# EAGLE board Gps_System_v1.00 (EAGLE 9.6.2)
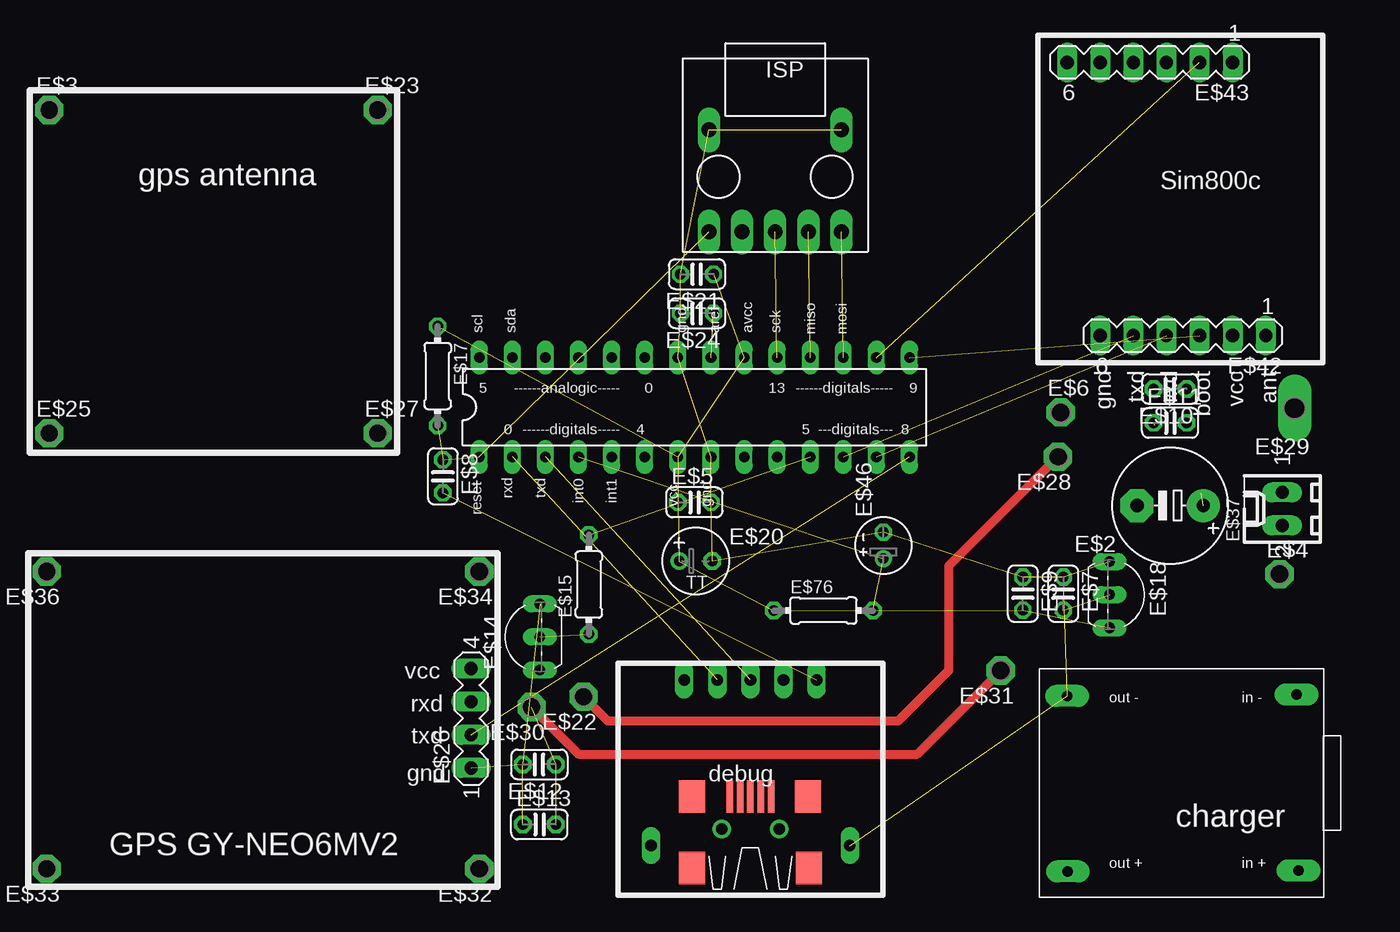
[diagram p0: board, top side]
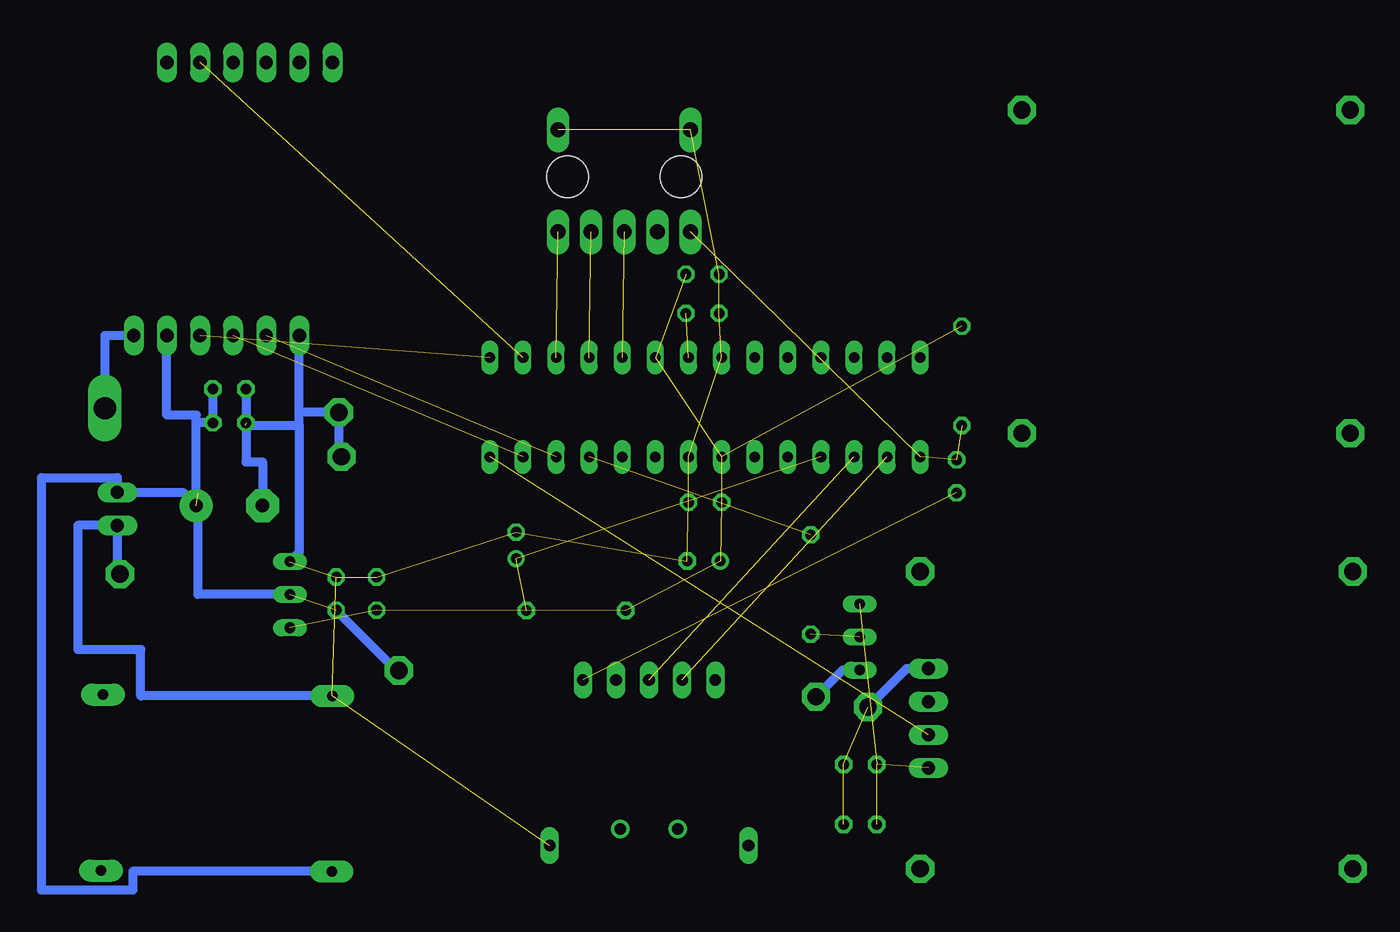
[diagram p1: board, bottom side, seen from below]

No outline drawn. Coordinates in mm, seen from the top.
Copper layers (1*16): Top 0.035mm / dielectric 1.5mm / Bottom 0.035mm
Design rules "default *": minimum track width 0.7mm, minimum drill 24mil, track to track 8mil, track to pad 8mil, pad to pad 8mil, via to via 8mil, smd to smd 8mil, copper to edge 40mil, drill to drill 8mil, minimum pad ring 10mil, minimum via ring 8mil, stop-mask expansion 4mil, vias tented up to drill 0mil, thermal gap 10mil

## Footprints (pad centres in the part's own frame; a part is rotated, then mirrored left to right if it is on the bottom)
USBMINIB = smd 2.5 x 0.5: D+ -3.85,0; D- -3.85,0.8; GND -3.85,-1.6; ID -3.85,-0.8; VBUS -3.85,1.6 | drill 0.9 long: P$1 5.08,0; P$2 5.08,2.54; P$3 5.08,5.08; P$4 5.08,-2.54; P$5 5.08,-5.08; P$6 -7.62,7.62; P$7 -7.62,-7.62 | drill 0.9: P$8 -6.35,2.2; P$9 -6.35,-2.2 | smd 2.5 x 2: P$10 -9.35,-4.5; P$11 -9.35,4.5; P$12 -3.85,-4.4; P$13 -3.85,4.5
E5-8,5 = drill 1.016 pad 2.54: + -2.54,0 | drill 1.016 pad 2.54 octagon: - 2.54,0
P1-13 = drill 1.321 pad 2.159 octagon: TP 0,0
C025-024X044 = drill 0.813 octagon: 1 -1.27,0; 2 1.27,0
TO92- = drill 0.813 long: 1 2.54,0; 2 0,0; 3 -2.54,0
0204/7 = drill 0.813 octagon: 1 -3.81,0; 2 3.81,0
USB-MICRO-PCB = drill 1.143 long: P$1 -5.08,6.35; P$2 -2.54,6.35; P$3 0,6.35; P$4 2.54,6.35; P$5 5.08,6.35; P$6 5.08,-1.47; P$7 -5.08,-1.47 | hole 3.2: -4.34,2.12; 4.36,2.12
ATMEGA328 = drill 0.813 long: 1 -16.51,-3.81; 2 -13.97,-3.81; 3 -11.43,-3.81; 4 -8.89,-3.81; 5 -6.35,-3.81; 6 -3.81,-3.81; 7 -1.27,-3.81; 8 1.27,-3.81; 9 3.81,-3.81; 10 6.35,-3.81; 11 8.89,-3.81; 12 11.43,-3.81; 13 13.97,-3.81; 14 16.51,-3.81; 15 16.51,3.81; 16 13.97,3.81; 17 11.43,3.81; 18 8.89,3.81; 19 6.35,3.81; 20 3.81,3.81; 21 1.27,3.81; 22 -1.27,3.81; 23 -3.81,3.81; 24 -6.35,3.81; 25 -8.89,3.81; 26 -11.43,3.81; 27 -13.97,3.81; 28 -16.51,3.81
TT2D5 = drill 0.813: + -1.27,0 | drill 0.813 octagon: - 1.27,0
MA04-1 = drill 1.016 long: 1 -3.81,0; 2 -1.27,0; 3 1.27,0; 4 3.81,0
P1-17Y = drill 1.702 pad 2.121 long: TP 0,0
6410-02 = drill 1.016 long: 1 1.27,0; 2 -1.27,0
LIPO_CHARGER = drill 0.8 pad 1.676 long: P$5 -8.3,6.85; P$6 9.3,6.95; P$7 -8.25,-6.6; P$8 9.45,-6.55
MA06-1 = drill 1.016 long: 1 -6.35,0; 2 -3.81,0; 3 -1.27,0; 4 1.27,0; 5 3.81,0; 6 6.35,0
E2-4 = drill 0.813 pad 1.27: + -1.016,0 | drill 0.813 pad 1.27 octagon: - 1.016,0

## Placement (x,y rotation side)
E$1  [USBMINIB]  56.2,12.2 90 top
E$2  [E5-8,5]  88.4,30.66 180 top
E$3  [P1-13]  2.4,61 0 top
E$4  [P1-13]  96.8,25.4 0 top
E$5  100nF  [C025-024X044]  51.9,30.9 0 top
E$6  [P1-13]  80,37.8 0 top
E$7  1uF  [C025-024X044]  80.2,23.9 270 top
E$8  0.1uF  [C025-024X044]  32.6,32.9 270 top
E$9  1uF  [C025-024X044]  77.1,23.9 270 top
E$10  100nF  [C025-024X044]  88.4,39.6 180 top
E$11  10uF  [C025-024X044]  88.4,37 0 top
E$12  100nF  [C025-024X044]  40,10.8 180 top
E$13  10uF  [C025-024X044]  40,6.2 0 top
E$14  S9013 h331  [TO92-]  40.04,20.58 90 top
E$15  1k  [0204/7]  43.8,24.6 90 top
E$16  [USB-MICRO-PCB]  58.1,58 180 top
E$17  10k  [0204/7]  32.2,40.6 270 top
E$18  MCP1702  [TO92-]  83.76,23.82 270 top
E$19  [ATMEGA328]  51.9,38.2 0 top
E$20  10uF  [TT2D5]  52,26.4 0 top
E$21  100nF  [C025-024X044]  52.1,48.4 180 top
E$22  [P1-13]  43.4,16 180 top
E$23  [P1-13]  27.6,61 0 top
E$24  100nF  [C025-024X044]  52.1,45.4 180 top
E$25  [P1-13]  2.4,36.2 0 top
E$26  [MA04-1]  34.77,14.34 90 top
E$27  [P1-13]  27.6,36.2 0 top
E$28  [P1-13]  79.8,34.4 180 top
E$29  [P1-17Y]  97.95,38.13 180 top
E$30  [P1-13]  39.4,15.2 180 top
E$31  [P1-13]  75.4,18 180 top
E$32  [P1-13]  35.4,2.8 180 top
E$33  [P1-13]  2.2,2.8 180 top
E$34  [P1-13]  35.4,25.6 180 top
E$36  [P1-13]  2.2,25.6 180 top
E$37  [6410-02]  97,30.4 90 top
E$41  [LIPO_CHARGER]  88.8,9.2 0 top
E$42  [MA06-1]  89.38,43.69 180 top
E$43  [MA06-1]  86.84,64.65 180 top
E$46  TILT SENSOR  [E2-4]  66.4,27.6 90 top
E$76  10k  [0204/7]  61.8,22.6 0 top

## Library data of the parts
E$1 E$16 E$19 E$41 = LSGPackages
E$2 = ref-packages-longpad
E$3 E$4 E$6 E$22 E$23 E$25 E$27-E$34 E$36 = testpad
E$5 E$7-E$13 E$21 E$24 E$46 = rcl
E$14 E$18 = transistor-fet
E$15 E$17 E$76 = eagle-ltspice
E$20 = resistor
E$26 E$42 E$43 = con-lstb
E$37 = con-molex

## Nets
GND: E$1.P$7 E$2.- E$4.TP E$5.2 E$6.TP E$7.1 E$9.1 E$10.2 E$11.1 E$14.3 E$16.P$6 E$16.P$7 E$18.3 E$19.8 E$19.22 E$20.- E$21.2 E$22.TP E$24.2 E$28.TP E$37.2 E$41.P$5 E$42.6 E$46.-
S$2: E$12.2 E$13.1 E$14.1 E$26.1
S$3: E$15.2 E$19.11
S$4: E$19.21 E$24.1
S$5: E$16.P$2 E$19.18
S$8: E$19.12 E$42.5
S$9: E$19.13 E$42.4
S$10: E$19.15 E$42.3
S$11: E$16.P$3 E$19.19
S$12: E$14.2 E$15.1
S$13: E$16.P$1 E$19.17
S$14: E$1.P$2 E$19.2
S$15: E$1.P$1 E$19.3
S$16: E$1.P$5 E$8.2
S$18: E$19.14 E$26.2
S$19: E$19.16 E$43.2
S$20: E$8.1 E$16.P$5 E$17.2 E$19.1
S$21: E$29.TP E$42.1
S$22: E$19.4 E$46.+ E$76.2
VCC3.3V: E$5.1 E$9.2 E$17.1 E$18.1 E$19.7 E$19.20 E$20.+ E$21.1 E$76.1
VCC5.1V: E$2.+ E$7.2 E$10.1 E$11.2 E$12.1 E$13.2 E$18.2 E$26.4 E$30.TP E$31.TP E$37.1 E$41.P$7 E$42.2

## Tracks (layer width: path | path; a pad name or v marks a point on that pad's centre or on a via)
GND  (14 unrouted)
  Top 0.7: E$22.TP 45.28,14.12 67.52,14.12 71.4,18 71.4,26 E$28.TP
  Bottom 0.7: 83.03,36.8 83.03,37.8 | 83.03,37.8 E$42.6 | 87.2,36.8 83.03,36.8 | E$41.P$5 95.2,16.05 95.2,19.6 100,19.6 100,29.13 E$37.2 97,25.4 E$4.TP | 83.03,36.8 83.03,27.09 E$18.3 | 83.03,37.8 E$6.TP 80,34.6 E$28.TP | E$10.2 E$11.1 87.13,34 85.86,34 E$2.- | E$14.3 41.36,18.04 E$22.TP
S$2  (3 unrouted)
S$3  (1 unrouted)
S$4  (1 unrouted)
S$5  (1 unrouted)
S$8  (1 unrouted)
S$9  (1 unrouted)
S$10  (1 unrouted)
S$11  (1 unrouted)
S$12  (1 unrouted)
S$13  (1 unrouted)
S$14  (1 unrouted)
S$15  (1 unrouted)
S$16  (1 unrouted)
S$18  (1 unrouted)
S$19  (1 unrouted)
S$20  (3 unrouted)
S$21
  Bottom 0.7: E$42.1 97.95,43.69 E$29.TP
S$22  (2 unrouted)
VCC3.3V  (8 unrouted)
VCC5.1V  (4 unrouted)
  Top 0.7: E$30.TP 43,11.6 69,11.6 E$31.TP
  Bottom 0.7: 90.94,37 E$2.+ 91.95,31.67 E$37.1 97,32.8 102.8,32.8 102.8,1.16 95.82,1.16 95.82,2.6 E$41.P$7 | 90.94,37 90.94,37.6 93.2,37.6 E$42.2 | E$18.2 83.76,23.84 90.8,23.84 90.8,31.6 | 90.94,37 E$11.2 E$10.1 | E$26.4 36.45,18.15 E$30.TP | E$7.2 75.57,18 E$31.TP

## Text on the board
tPlace: ISP | gps antenna | Sim800c | gnd | txd | rxd | boot | vcc | ant | vcc | reset | rxd | txd | rx | gnd | tx | debug | GPS GY-NEO6MV2 | charger